# Altium PCB Relay-Driver10A.PcbDoc (part 3 of 3)
Units mil, origin at the board's own origin, x right, y up, seen from the top; angles counter-clockwise.
Board outline 10588 x 8047 mil, 4 copper layers (Top Layer, Layer 1, Layer 2, Bottom Layer), stack 61.653 mil thick; 39 components, 30 nets, 139 pads, 350 vias.
Unrouted connection lines stored in the file: 118.
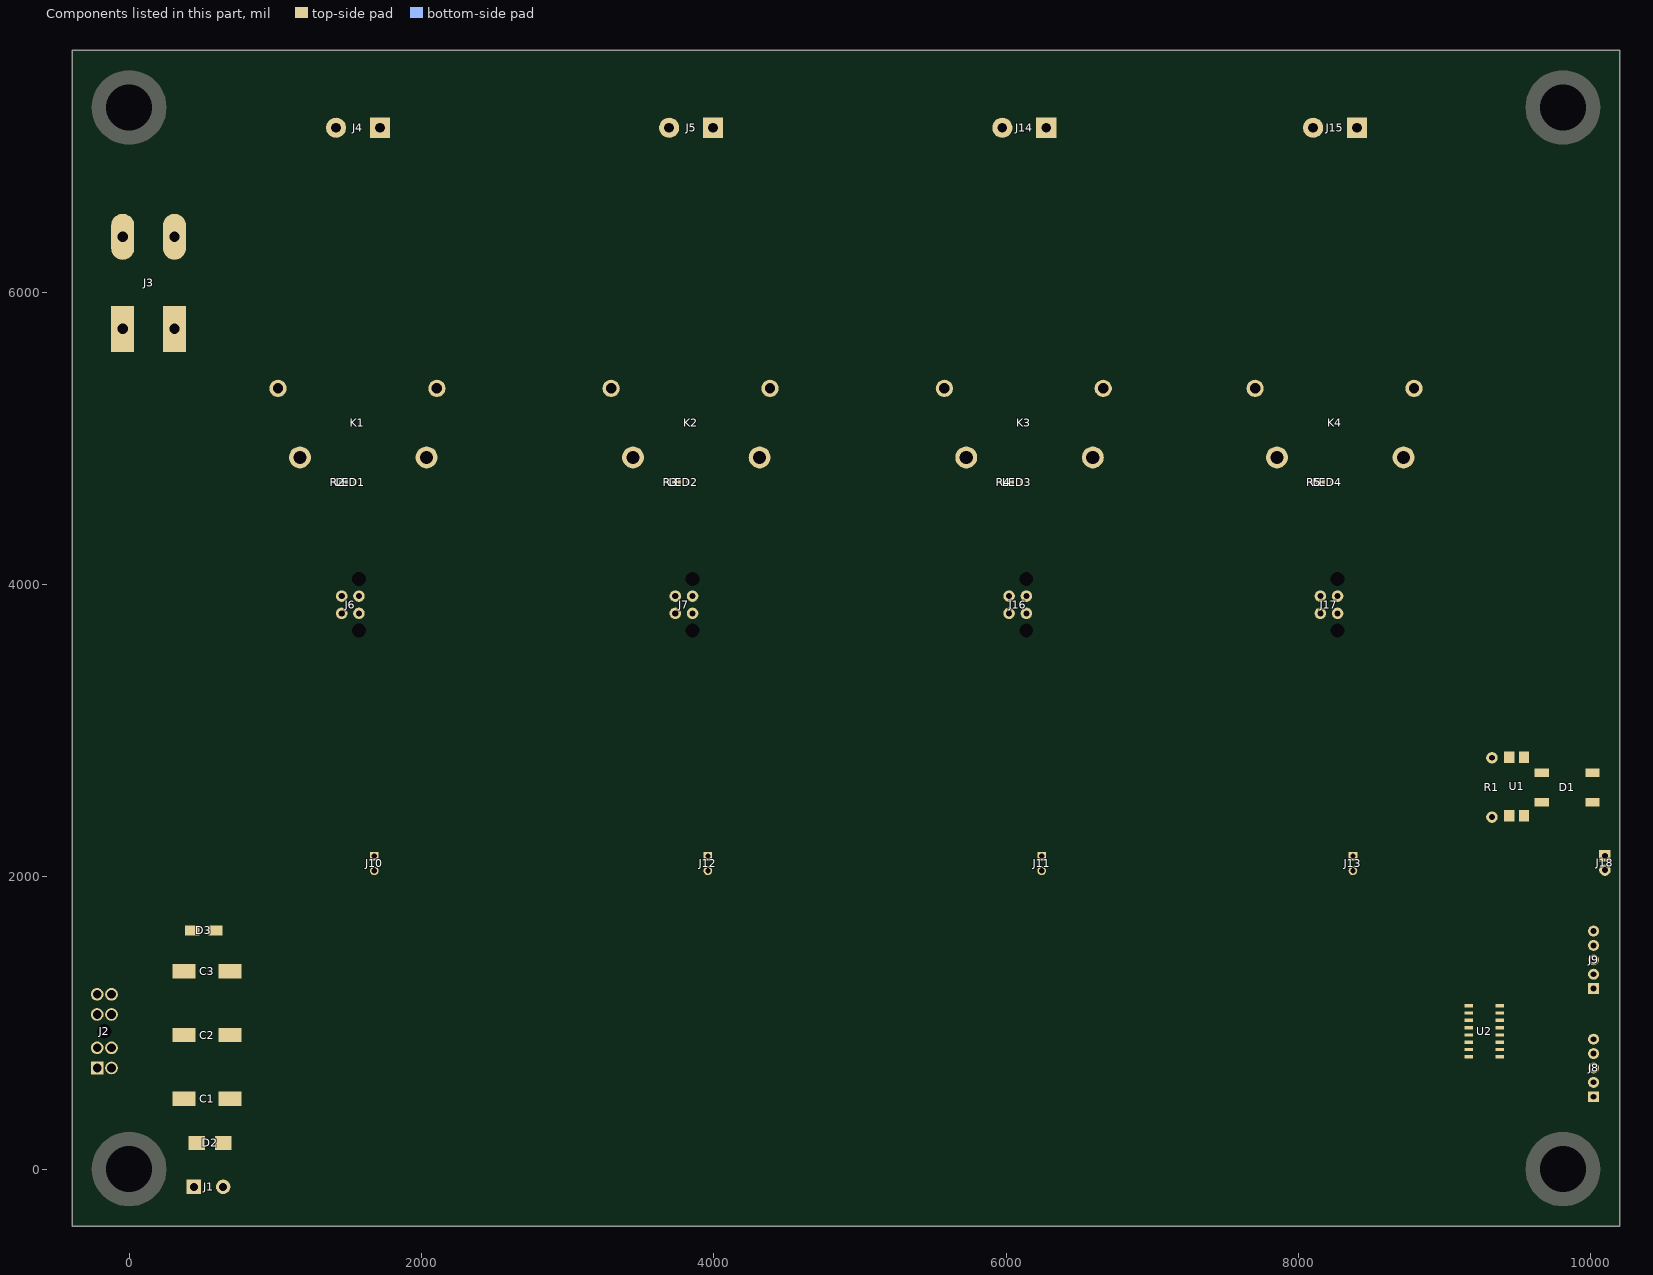
[diagram p4: the components of this part, seen from the top]

## Dimensions (continued)
10198,7655 to -390,7655 on Dimension

## Text inside footprints (layer, text, board x,y; h text height)
J2: Top Overlay "1" at -210.79,623.97 h31.5 r90
J6: Top Overlay "1" at 1434,3976 h31.5 r270
J7: Top Overlay "1" at 3716.33,3976 h31.5 r270
J16: Top Overlay "1" at 5999.66,3976 h31.5 r270
J17: Top Overlay "1" at 8129,3976 h31.5 r270
K1: Top Overlay "1" at 1940.12,4894.13 h31.5 r180
K2: Top Overlay "1" at 4218.79,4894.13 h31.5 r180
K3: Top Overlay "1" at 6498.46,4894.13 h31.5 r180
K4: Top Overlay "1" at 8624.12,4894.13 h31.5 r180